# Altium PCB Zotino-DIOT.PCBDOC (part 10 of 11)
Units mil, origin at the board's own origin, x right, y up, seen from the top; angles counter-clockwise.
Board outline 8771.61 x 3949.04 mil, 4 copper layers (TopLayer, Internal Plane 2, Signal Layer 1, BottomLayer), stack 61.54 mil thick; 915 components, 534 nets, 3073 pads, 1180 vias.
Unrouted connection lines stored in the file: 36.
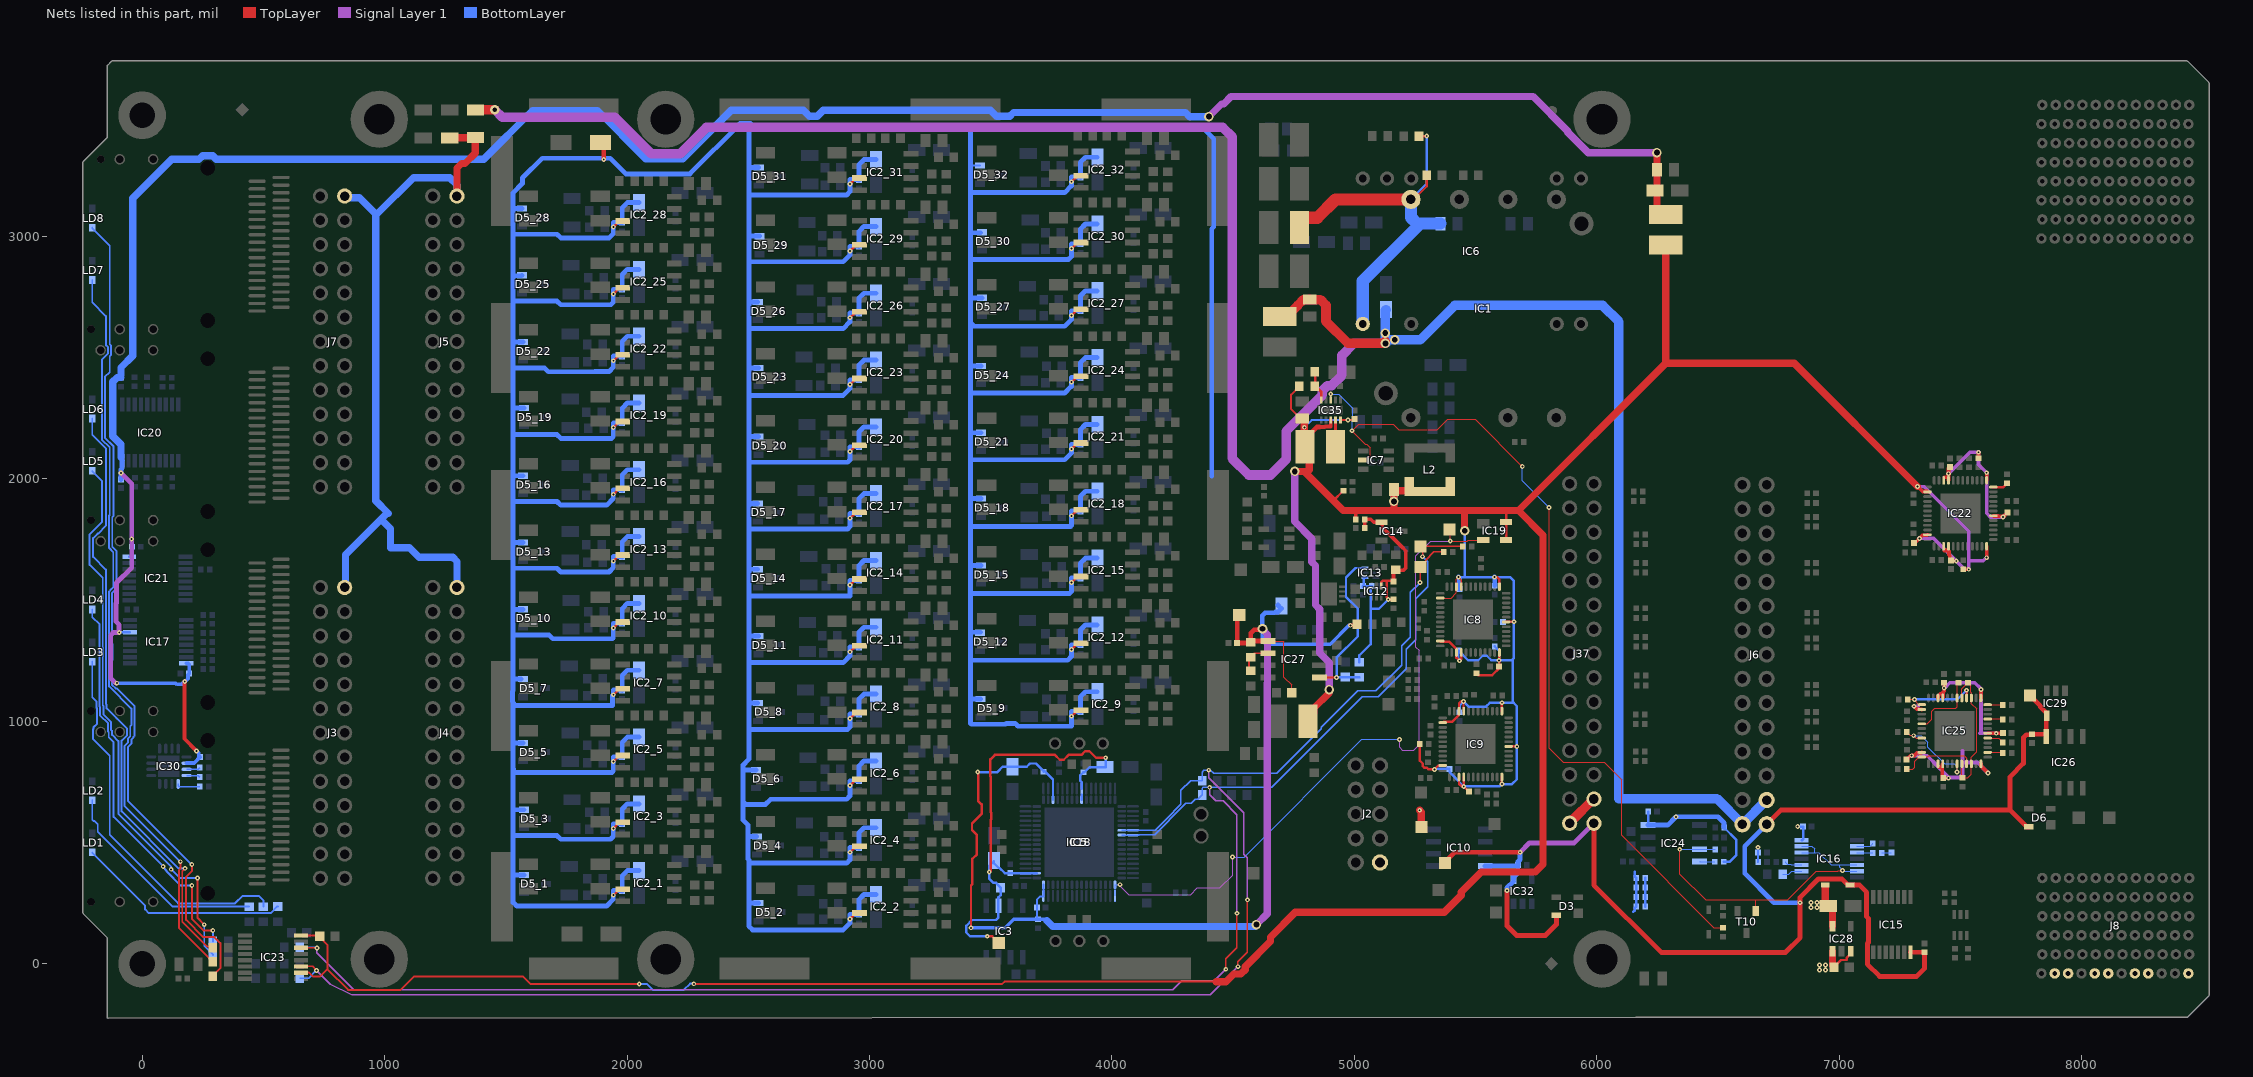
[diagram p11: the nets of this part, all layers, seen from the top]

## Via types
v1: diameter 19.68, hole 7.87, TopLayer to BottomLayer, tented both sides, 1050 vias
v2: diameter 23.62, hole 11.81, TopLayer to BottomLayer, tented both sides, 56 vias
v3: diameter 23.62, hole 11.81, TopLayer to BottomLayer, 28 vias
v4: diameter 39.37, hole 23.62, TopLayer to BottomLayer, tented both sides, 28 vias
v5: diameter 39.37, hole 19.68, TopLayer to BottomLayer, tented both sides, 7 vias
v6: diameter 19.68, hole 7.87, TopLayer to BottomLayer, tented bottom, 7 vias
v7: diameter 19.68, hole 7.87, TopLayer to BottomLayer, 4 vias

## Nets (pads, with @x,y where several pads share a name; then routed paths per layer and width w, separated by ;. In a path a pad name is that pad's centre, name@x,y a point inside that pad or via, vN(x,y) a via of type N, cw(c..) or ccw(c..) an arc to the next point about the centre after c; other vN are vias at no path point) (continued)
NetIC22_36: IC22.36 R100.2 | length 63.3
  TopLayer w10: IC22.36@7635.83,1966.54 7677.17,1966.54 7692.13,1981.5 R100.2@7692.91,1981.5
NetIC24_4: IC24.4 R221.1 | length 64.1
  BottomLayer w5: IC24.4@6423.76,422.31 6425,421.07 R221.1@6487.31,421.07
NetIC25_1: IC25.1 IC25.40 R112.2 | length 326.7
  TopLayer w5: R112.2@7282.28,1090.55 v1@7307.09,1090.55 ; v1@7309.06,1088.58 7328.74,1068.9 IC25.1@7340.55,1068.9
  TopLayer w10: v1(7525.06,1128.49) 7525.59,1127.95 IC25.40@7525.59,1096.46
  BottomLayer w10: v1(7311.02,1090.55) 7487.12,1090.55 v1(7525.06,1128.49) v1@7524.85,1128.7
NetIC25_5: IC25.5 IC25.42 R126.2 | length 295.2
  TopLayer w5: IC25.5@7340.55,990.16 7364.17,990.16 7381.89,1007.87 7381.89,1042.1 7394.91,1055.12 7480.32,1055.12 7486.22,1061.02 IC25.42@7486.22,1096.46 7486.22,1152.76 R126.2@7492.13,1158.66
NetIC25_8: IC25.8 IC25.19 R129.2 | length 373.5
  TopLayer w5: R129.2@7278.35,956.69 7278.35,955.91 7287.26,946.99 7288.05,946.99 7291.28,943.75 7304.28,943.75 v1(7307.09,940.94) 7316.93,931.1 IC25.8@7340.55,931.1 ; v1(7486.22,790.65) IC25.19@7486.22,824.8
  BottomLayer w5: v1(7307.09,940.94) 7338.58,940.94 7366.14,913.39 7366.14,893.7 7434.75,825.09 7474.17,825.09 7486.22,813.04 v1(7486.22,790.65)
NetIC25_12: IC25.12 IC25.21 R133.2 | length 311.6
  TopLayer w5: R133.2@7278.35,803.15 7303.15,803.15 7311.02,811.02 7311.02,834.65 7328.74,852.36 IC25.12@7340.55,852.36 7341.85,853.67 7365.48,853.67 7370.08,858.27 7515.75,858.27 7525.59,848.43 IC25.21@7525.59,824.8
NetIC25_20: IC25.20 IC25.22 IC25.39 IC25.41 R111.1 R132.1 | length 577.2
  TopLayer w5: IC25.20@7505.91,824.8 7505.91,768.5 R132.1@7507.87,766.54 7530.31,766.54 7545.28,781.5 IC25.22@7545.28,824.8 7545.28,852.36 7566.93,874.02 7566.93,1051.18 7545.28,1072.83 IC25.39@7545.28,1096.46 7543.97,1097.76 7543.97,1118.99 7543.1,1119.87 7543.1,1146.27 7541.2,1148.17 7541.2,1149.74 7532.28,1158.66 R111.1@7531.5,1158.66 7530.71,1158.66 7505.91,1133.86 IC25.41@7505.91,1096.46
NetIC25_26: IC25.26 R135.2 | length 67
  TopLayer w5: IC25.26@7612.2,872.05 7676.38,872.05 R135.2@7674.41,870.08
NetIC25_29: IC25.29 R131.2 | length 70
  TopLayer w5: IC25.29@7612.2,931.1 7657.48,931.1 7674.41,914.17 R131.2@7674.41,913.39
NetIC25_33: IC25.33 R128.2 | length 63
  TopLayer w5: IC25.33@7612.2,1009.84 7672.44,1009.84 R128.2@7674.41,1007.87
NetIC25_36: IC25.36 R125.2 | length 63
  TopLayer w5: IC25.36@7612.2,1068.9 7672.44,1068.9 R125.2@7674.41,1066.93
NetIC27_2: IC27.2 R150.1 R153.2 | length 142.5
  TopLayer w7.87: R153.2@4571.23,1205.91 4566.23,1210.91 4566.23,1260.91 4586.43,1281.11 IC27.2@4643.32,1281.11
NetIC30_1: IC30.1 R165.2 | length 98.7
  BottomLayer w6: IC30.1@148.62,742.13 148.62,734.17 152.22,730.58 R165.2@237.88,730.58
NetIC30_15: IC30.15 R159.2 | length 57.8
  BottomLayer w6: IC30.15@183.07,802.17 230.73,802.17 R159.2@237.88,809.32
NetIC30_16: IC30.16 R161.2 | length 57.6
  BottomLayer w6: IC30.16@183.07,776.57 231.25,776.57 R161.2@237.88,769.95
NetIC35_5: IC35.5 R162.1 R164.2 | length 117.5
  TopLayer w12: R164.2@4838.84,2432.89 4838.84,2382.89 4863.44,2358.28 IC35.5@4863.44,2325.57
NetIC35_9: IC35.9 L16.1 | length 75.6
  TopLayer w13: IC35.9@4922.5,2242.89 4922.5,2169.23 L16.1@4923.84,2167.89
NetLD1_2: LD1.2 R113.2 | length 891.4
  BottomLayer w8: LD1.2@-206,459.82 -206,457.85 11.81,240.04 11.81,224.41 26.94,209.28 530.82,209.28 558.03,236.5 R113.2@560,236.5
NetLD2_2: LD2.2 R114.2 | length 894
  BottomLayer w8: LD2.2@-206,674.82 -206,594.39 -201.31,589.71 -196.92,589.71 -183.22,576.01 -183.22,545.43 126.2,236 R114.2@441.2,236
NetLD3_2: LD3.2 R115.2 | length 1555.6
  BottomLayer w8: LD3.2@-206,1246.38 -206,1100.07 -188.61,1082.68 -188.61,1055.58 -186.12,1053.09 -186.12,991.05 -200.79,976.38 -200.79,970.29 -202.15,968.93 -202.15,926.56 -133.86,858.27 -133.86,531.5 148.64,249 382.86,249 414.33,280.47 481.26,280.47 500.26,261.47 R115.2@500.26,236
NetLD4_2: LD4.2 R119.2 | length 1625.1
  TopLayer w8: v1(204.72,322.83) 204.72,185.04 251.97,137.8 v1(291.34,137.8)
  BottomLayer w8: LD4.2@-206,1461.73 -206,1430.41 -175.61,1400.02 -175.61,1297.61 -175.35,1297.35 -175.35,1274.15 -175.61,1273.89 -175.61,1060.97 -173.12,1058.48 -173.12,1023.51 -140.95,991.35 -140.95,958.83 -137.8,955.67 -137.8,934.53 -118.11,914.84 -118.11,606.3 v1(86.61,401.57) 86.61,398.41 100.31,384.72 100.31,382.38 159.85,322.83 v1(204.72,322.83) ; v1(291.34,137.8) 291.34,92.56 R119.2@291.6,92.3
NetLD5_2: LD5.2 R120.2 | length 2288.3
  TopLayer w8: v1(228.35,354.33) 228.35,188.98 v1(255.91,161.42)
  BottomLayer w8: LD5.2@-206,2033.78 -206,2031.81 -165.35,1991.17 -165.35,1822.83 -216.54,1771.65 -216.54,1645.67 -162.61,1591.74 -162.61,1302.99 -162.35,1302.73 -162.35,1268.76 -162.61,1268.5 -162.61,1066.35 -160.12,1063.86 -160.12,1028.9 -127.95,996.73 -127.95,964.21 -124.41,960.66 -124.41,944.53 -98.43,918.55 -98.43,618.11 118.11,401.57 118.11,391.22 v1(119.57,389.76) 155,354.33 v1(228.35,354.33) ; v1(255.91,161.42) 255.91,74.84 291.6,39.15 R120.2@291.6,37.18
NetLD6_2: LD6.2 R121.2 | length 2490.1
  TopLayer w8: v1(177.17,393.7) 165.35,381.89 165.35,173.23 266.57,72.02 286.29,72.02 R121.2@291.6,66.71
  BottomLayer w8: LD6.2@-206,2249.13 -206,2182.38 -149.41,2125.79 -149.41,1807.09 -181.73,1774.77 -183.71,1774.77 -202.15,1756.33 -202.15,1678.53 -149.61,1625.98 -149.61,1308.38 -149.35,1308.12 -149.35,1263.38 -149.61,1263.12 -149.61,1071.74 -147.12,1069.25 -147.12,1053.85 -105.45,1012.19 -105.37,1012.19 -62.1,968.93 -62.1,943.53 -85.06,920.58 -85.06,628.36 149.61,393.7 v1(177.17,393.7)
NetLD7_2: LD7.2 R122.2 | length 3084.3
  TopLayer w8: v1(157.48,421.26) 157.48,392.4 152.35,387.27 152.35,146.9 R122.2@291.6,7.65
  BottomLayer w8: LD7.2@-206,2820.82 -206,2728.01 -149.61,2671.61 -149.61,2552.49 -140.84,2543.73 -140.84,2518.33 -166.54,2492.63 -166.54,2162.61 -133.86,2129.92 -133.86,1850.88 -136.41,1848.33 -136.41,1715.15 -119.3,1698.04 -119.3,1553.93 -129.92,1543.31 -129.92,1542.01 -136.61,1535.32 -136.61,1313.76 -136.35,1313.5 -136.35,1257.99 -136.61,1257.73 -136.61,1144.48 -44.5,1052.37 -44.5,984.25 -49.1,979.65 -49.1,938.15 -59.06,928.19 -59.06,912.09 -72.06,899.09 -72.06,650.8 v1(157.48,421.26)
NetLD8_2: LD8.2 R123.2 | length 3432.9
  TopLayer w8: v1(204.72,409.45) 204.72,381.89 181.1,358.27 181.1,181.1 251.97,110.24 298.2,110.24 310.52,97.92 322.83,85.6 322.83,-18.19 291.6,-49.43 R123.2@291.6,-51.4
  BottomLayer w8: LD8.2@-206,3036.69 -206,3034.72 -133.86,2962.58 -133.86,2555.13 -127.84,2549.11 -127.84,2512.95 -133.86,2506.93 -133.86,2440.94 -153.54,2421.26 -153.54,2169.29 -118.11,2133.86 -118.11,1848.24 -123.41,1842.94 -123.41,1720.53 -106.3,1703.42 -106.3,1547.24 -123.61,1529.94 -123.61,1319.15 -123.35,1318.89 -123.35,1252.61 -123.61,1252.35 -123.61,1149.86 -109.7,1135.96 -104.46,1135.96 -31.5,1062.99 -31.5,940.94 -36.1,936.34 -36.1,932.76 -43.31,925.56 -43.31,909.45 -59.06,893.7 -59.06,673.23 v1(204.72,409.45)
NetR220_1: R220.1 R225.2 | length 41.1
  BottomLayer w5: R220.1@7175.15,457.49 7213.94,457.49 R225.2@7215.58,459.13
P3V3: C19.2 C20.2 C21.2 C22.2 C23.2 C24.2 C25.2 C26.2 C49.2 C51.2 C52.2 C54.2 C55.2 C57.2 C58.2 C59.2 C69.2 C70.2 C96.2 C148.2 C149.2 IC8.2 IC8.11 IC8.15 IC8.16 IC8.24 IC8.30 IC8.37 IC8.45 IC8.46 IC9.2 IC9.11 IC9.15 IC9.16 IC9.24 IC9.30 IC9.37 IC9.45 IC9.46 IC19.3 IC19.4 IC22.2 IC22.11 IC22.15 IC22.16 IC22.24 IC22.30 IC22.37 IC22.45 IC22.46 IC23.10 IC23.16 IC25.2 IC25.11 IC25.15 IC25.16 IC25.24 IC25.30 IC25.37 IC25.45 IC25.46 IC35.8 IC35.10 L1.1 L2.2 L3.1 L16.2 R6.2 R18.1 R22.1 R33.2 R42.1 R95.2 R105.1 R162.2 TP10.1 | length 20128.9
  TopLayer w5: IC8.2@5354.32,1508.61 5399.89,1508.61 5421.25,1529.97 IC8.46@5421.25,1555.85 5421.25,1586.99 v1(5429.15,1594.89)
  TopLayer w8: IC23.10@655.77,-36.64 688.37,-36.64 703.84,-52.11 733.84,-52.11 763.84,-22.11 ; IC23.16@655.77,116.91 728.33,116.91 C96.2@732.34,112.89 732.34,109.39 763.84,77.89 763.84,-22.11 ; v1(2050.34,-83.2) 1601.02,-83.2 1569.93,-52.11 1122.05,-52.11 1066.26,-107.9 849.63,-107.9 763.84,-22.11 ; v1@2275.59,-83.2 3547.5,-83.2 3557.5,-73.2 4429,-73.2 ; C149.2@4768.84,2257.89 4738.84,2287.89 4738.84,2347.89 4772.89,2381.94 R162.2@4772.89,2382.65 ; C149.2@4793.84,2247.89 4795.85,2245.88 v1@4795.85,2212.89 ; IC35.10@4943.84,2242.89 v1(4973.84,2242.89) 4997.3,2242.89 C148.2@5001.24,2246.83 ; v1(5429.15,1594.89) 5440.94,1583.1 IC8.45@5440.94,1555.85
  TopLayer w10: 4914.27,1910.95 R33.2@4954.49,1951.17 ; R22.1@5269.64,905.89 5269.64,838.36 5282.34,825.66 5282.34,815.31 5288.2,809.45 5298.55,809.45 5306.11,801.89 v1(5330.15,801.89) 5346.05,817.79 IC9.11@5364.72,817.79 ; IC8.11@5354.32,1331.44 5356.45,1329.31 5390.76,1329.31 5421.25,1298.82 IC8.15@5421.25,1284.2 5421.25,1262.79 v1(5434.15,1249.89) 5440.94,1256.68 IC8.16@5440.94,1284.2 ; IC9.2@5364.72,994.95 5367.88,998.11 5403.37,998.11 5431.65,1026.39 IC9.46@5431.65,1042.2 5431.65,1073.85 5439.7,1081.89 v1(5450.15,1081.89) 5450.15,1043.39 IC9.45@5451.34,1042.2 ; IC9.15@5431.65,770.54 5431.65,741.73 5434.8,738.57 5436.61,738.57 5442.47,732.72 5442.47,731.89 v1(5451.32,731.89) C24.2@5472.83,710.37 ; v1(5451.32,731.89) IC9.16@5451.34,770.54 ; R18.1@5503.15,1198.39 5511.24,1190.29 5568.55,1190.29 5598.42,1220.16 v1@5598.42,1251.89 ; v1(5578.15,1594.89) 5588.15,1594.89 5598.42,1584.62 IC8.37@5598.42,1555.85 ; v1(5597.15,1251.89) v1@5598.42,1251.89 ; IC8.24@5598.42,1284.2 v1@5598.42,1251.89 ; v1(5608.82,741.22) IC9.24@5608.82,770.54 ; IC9.37@5608.82,1042.2 5608.82,1076.56 v1(5609.15,1076.89) ; 5614.36,1869.61 5625.75,1858.22 IC19.4@5625.75,1822.79 IC19.3@5625.75,1747.98 ; IC8.30@5625.97,1410.18 v1@5657.44,1410.18 ; IC9.30@5636.38,896.53 5669.79,896.53 v1(5670.15,896.89)
  TopLayer w15: 4857.05,2214.11 4877.11,2214.11 4879.61,2216.61 4902.81,2216.61 IC35.8@4902.81,2242.89 ; R42.1@5005.43,1833.49 5005.43,1869.28 5005.76,1869.61 ; C55.2@7277.56,842.52 7292.75,857.71 7297.91,857.71 v1(7298.81,858.61) 7299.36,859.15 7309.5,859.15 7321.12,870.77 7339.27,870.77 IC25.11@7340.55,872.05 ; v1(7309.06,1062.34) 7309.27,1062.34 7321.12,1050.49 7339.27,1050.49 IC25.2@7340.55,1049.21 ; C49.2@7309.06,1736.22 7313.76,1740.93 7317.26,1740.93 v1(7331,1754.67) 7344.74,1768.41 7362.89,1768.41 IC22.11@7364.17,1769.69 ; v1(7322.83,1968.5) 7324.36,1968.5 7344.74,1948.13 7362.89,1948.13 IC22.2@7364.17,1946.85 ; IC25.46@7407.48,1096.46 7407.48,1105.08 7416.57,1114.17 7422.5,1114.17 7428.44,1120.12 ; IC25.15@7409.07,814.59 7412.81,810.85 IC25.16@7425.57,810.85 ; IC25.16@7425.57,823.21 IC25.16@7425.57,810.85 ; IC25.45@7428.44,1097.74 7428.44,1120.12 ; IC22.15@7432.7,1705.1 7449.97,1705.1 7453.05,1702.02 7453.05,1688.43 ; C58.2@7433.07,1159.45 v1(7433.07,1137.4) 7433.07,1124.74 7428.44,1120.12 ; IC22.46@7434.5,2006.59 IC22.45@7446.92,2006.59 ; IC22.45@7450.79,1994.09 7450.79,2018.7 7450.79,2043.31 C52.2@7456.69,2049.21 ; v1(7451.18,765.75) C57.2@7429.13,765.75 7424.43,770.45 7424.43,809.71 IC25.16@7425.57,810.85 ; 7455.93,1684.06 7455.93,1668.09 C51.2@7460.63,1663.39 7461.7,1662.31 7481.78,1662.31 v1(7482.68,1661.42) ; R105.1@7511.81,1627.17 v1(7534.25,1627.17) ; R95.2@7574.8,2085.43 v1(7574.8,2110.24) ; IC25.24@7584.65,824.8 7584.65,816.18 7613.42,787.4 v1(7614.17,787.4) ; IC25.37@7584.65,1096.46 v1(7584.65,1131.89) ; v1(7608.27,1675.2) IC22.24@7608.27,1722.44 ; IC22.37@7608.27,1994.09 v1(7608.27,2025.59) ; IC25.30@7612.2,950.79 v1(7647.64,950.79) 7648.53,951.68 7674.12,951.68 C59.2@7675.2,952.76 ; IC22.30@7635.83,1848.43 7637.11,1847.15 7656.69,1847.15 7658.07,1845.77 v1@7675.72,1845.77 ; v1(7675.72,1843.04) C54.2@7694.88,1862.2
  TopLayer w20: L16.2@4795.85,2164.9 4845.06,2214.11 4857.05,2214.11
  TopLayer w30: 4429,-74 4470.52,-74 4502.87,-41.65 4532.05,-41.65 4549.53,-24.17 4549.53,-11.75 4654.61,93.33 4654.61,110.09 4756.65,212.13 5370.71,212.13 5441.02,282.45 5441.02,296.04 5523.54,378.55 5745.95,378.55 5778.23,410.83 5778.23,1768.24 5676.85,1869.61 ; v4(4753.7,2031.03) 4793.07,2031.03 4913.15,1910.95 ; C149.2@4785.61,2247.89 4793.84,2247.89 v1(4793.84,2212.89) 4793.84,2134.9 L16.2@4795.85,2132.89 ; L16.2@4795.85,2119.9 4783.84,2107.89 4813.84,2077.89 4813.84,2037.89 ; L1.1@4809.46,1012.62 4833.83,1036.99 4833.83,1055.06 4895.06,1116.29 4895.06,1129.4 v4(4896.86,1131.19) ; 4914.27,1910.95 4913.15,1910.95 ; v4(5163.48,1907.24) v4@5163.8,1906.92 ; v1(5269.45,633.39) 5276.34,626.5 TP10.1@5276.34,564.5 ; L2.2@5311.37,1948.12 5307.66,1951.82 5168.66,1951.82 C25.2@5163.8,1956.68 v4@5163.8,1906.92 ; v4(5455.46,1786.2) 5454.48,1787.18 5454.48,1869.61 ; L3.1@6284.45,2964.57 6284.45,2477.21 ; v1(7322.83,1968.5) 6814.13,2477.21 6284.45,2477.21 ; 4913.15,1910.95 4954.49,1869.61 5005.76,1869.61 5163.8,1869.61 ; 5163.8,1869.61 5454.48,1869.61 ; 5163.8,1869.61 v4@5163.8,1906.92 ; 5454.48,1869.61 5614.36,1869.61 5676.85,1869.61 ; 5676.85,1869.61 6284.45,2477.21
  Signal Layer 1 w15: v1(7298.81,858.61) 7363.23,858.61 7407.75,814.09 7407.75,812.62 7452.06,768.31 7495.47,768.31 7508.56,781.4 7508.56,830.09 ; v1(7309.06,1062.34) 7309.95,1061.44 7325.91,1061.44 ; v1(7322.83,1968.5) 7323.73,1967.61 7351.19,1967.61 7534.25,1784.54 7534.25,1669.29 ; v1(7331,1754.67) 7389.43,1754.67 v1(7482.68,1661.42) ; v1(7433.07,1137.4) 7434.34,1137.4 7456.39,1159.45 7559.64,1159.45 7583.75,1135.34 7583.75,1132.79 v1(7584.65,1131.89) 7584.65,954.87 7580.56,950.79 v1(7647.64,950.79) ; v1(7450.79,2021.65) 7539.37,2110.24 v1(7574.8,2110.24) 7574.8,2059.06 v1(7608.27,2025.59) 7608.27,1858.56 7623.79,1843.04 v1(7675.72,1843.04) ; v1@7483.57,1660.52 7516.93,1627.17 v1(7534.25,1627.17) 7534.25,1669.29 ; 7508.56,878.79 7508.56,830.09 ; v1(7608.27,1675.2) 7607.78,1675.2 7594.6,1662.02 7541.52,1662.02 7534.25,1669.29 ; v1(7614.17,787.4) 7571.48,830.09 7508.56,830.09
  Signal Layer 1 w30: v4@4753.7,2028.5 4753.7,1824.34 4824.56,1753.47 4824.56,1658.12 4839.66,1643.02 4839.66,1479.98 4857.57,1462.08 4857.57,1282.46 4896.86,1243.17 v4(4896.86,1131.19)
  BottomLayer w8: v1(2050.34,-83.2) 2081.86,-83.2 2106.56,-107.9 2233.16,-107.9 2259.74,-81.32 2274.23,-81.32 v1(2275.59,-82.68) ; v1(4793.84,2212.89) 4823.84,2242.89 v1(4973.84,2242.89)
  BottomLayer w10: v1(5330.15,801.89) 5332.15,803.89 C69.2@5392.43,803.89 5392.43,790.77 v1(5451.32,731.89) 5599.49,731.89 v1(5608.82,741.22) 5650.48,741.22 5670.15,760.89 v1(5670.15,896.89) 5670.15,1063.54 5656.8,1076.89 ; v1(5429.15,1594.89) 5455.15,1594.89 ; C70.2@5434.15,1037.61 5434.15,1065.89 v1(5450.15,1081.89) 5470.99,1061.05 5543.37,1061.05 5559.21,1076.89 v1(5609.15,1076.89) 5656.8,1076.89 ; v1(5434.15,1249.89) 5429.15,1254.89 C22.2@5429.15,1292.17 5469.43,1251.89 5511.09,1251.89 5529.93,1270.73 5546.37,1270.73 5565.21,1251.89 v1(5597.15,1251.89) ; v4(5455.46,1786.2) 5455.15,1785.88 5455.15,1594.89 ; C20.2@5579.15,1309.17 5597.15,1291.17 v1(5597.15,1251.89) ; C19.2@5612.86,1409.89 5657.15,1409.89 v1(5658.15,1410.89) ; 5455.15,1594.89 v1(5578.15,1594.89) 5642.05,1594.89 5658.15,1578.8 v1(5658.15,1410.89) ; v1(5597.15,1251.89) 5648.79,1251.89 5653.53,1256.64 ; 5653.53,1256.64 5658.15,1261.25 v1(5658.15,1410.89) ; 5653.53,1256.64 5653.53,1080.16 5656.8,1076.89
  BottomLayer w20: v1(5429.15,1594.89) 5433.15,1590.89 C23.2@5433.15,1546.61 ; v1(5578.15,1594.89) 5579.15,1593.89 C21.2@5579.15,1559.61
  BottomLayer w30: v4(5163.48,1907.24) 5163.64,1907.4 5163.64,1956.52 C26.2@5163.8,1956.68
P3V3_MP: C38.2 C39.2 C48.2 D3.4 D6.4 D7.1 IC10.8 IC15.14 IC26.8 IC29.4 IC32.4 J6.30 J37.30 TP13.1 TP21.1 | length 6121.2
  TopLayer w20: TP13.1@5366.16,412.92 5413.41,460.17 v1(5683.99,460.17) ; v1(5629.79,302.69) 5629.79,156.6 5669.54,116.85 5788.34,116.85 5833.73,162.24 D3.4@5833.73,199.98 ; J37.30@5988.23,579.89 5988.23,324.76 6265.75,47.24 6778.54,47.24 6838.58,107.28 6838.58,274.46 6914.51,350.39 7011.28,350.39 D7.1@7036.96,324.72 ; J6.30@6700.79,575.59 6759.06,633.86 7704.72,633.86 ; D7.1@7044.67,324.56 7083.9,324.56 7113.19,295.28 7113.19,195.31 7120.4,188.1 7120.4,88.14 7116.49,84.22 7116.49,-2.05 7166.6,-52.17 7319.88,-52.17 7351.39,-20.65 C39.2@7351.39,47.62 7351.26,47.49 7294.02,47.49 IC15.14@7293.89,47.36 ; D6.4@7781.5,564.96 7773.62,564.96 7704.72,633.86 ; TP21.1@7787.4,1106.3 7830.69,1063.01 7830.69,1059.08 7856.3,1033.46 IC29.4@7856.3,1023.62 7856.3,1013.78 7854.13,1011.61 IC26.8@7854.13,945.04 ; IC26.8@7854.13,937.01 IC26.8@7854.13,945.04 ; 7704.72,633.86 7704.72,771.65 7759.84,826.77 7759.84,933.07 7771.42,944.65 7793.07,944.65 C48.2@7795.28,946.85 7852.32,946.85 IC26.8@7854.13,945.04
  Signal Layer 1 w20: v1(5683.99,460.17) 5722.46,498.63 5906.97,498.63 J37.30@5988.23,579.89
  BottomLayer w20: IC10.8@5539.61,403.87 C38.2@5672.86,403.87 ; v1(5629.79,302.69) 5629.79,313.53 IC32.4@5657.11,340.85 ; IC32.4@5656.6,350.18 5656.6,360.02 5658.41,361.83 5662.12,361.83 5673.84,373.55 C38.2@5673.84,405.18 ; C38.2@5675.79,407.38 5675.79,421.4 5683.99,429.6 v1(5683.99,460.17) ; J6.30@6700.79,575.59 6610.24,485.04 6610.24,372.85 6731.12,251.97 v1(6838.58,251.97)
P3V3_MP_B: C43.2 C103.2 C109.1 D7.2 IC16.14 IC24.8 IC28.5 R76.1 R221.2 R226.2 R227.2 | length 936.9
  TopLayer w30: D7.2@6942.31,318.88 6942.31,248.61 6951.92,239 C109.1@6955.02,239 6962.91,239 6972.52,229.4 IC28.5@6972.52,153.9
  BottomLayer w10: IC24.8@6211.17,572.31 6212.37,573.52 C103.2@6212.37,627.51 ; R221.2@6524.31,421.07 6524.6,421.36 6549.26,421.36 6574.8,446.91 6574.8,512.25 6526.11,560.95 R76.1@6526.11,561.73 ; R227.2@6665.12,458.9 v1(6665.12,480.95) v1@6665.35,480.72 ; R226.2@6665.14,420.27 R227.2@6665.12,458.9 ; v1(6828.8,565.85) C43.2@6851.05,565.85 6851.05,514 6847.19,510.14 IC16.14@6844.99,510.14
  BottomLayer w20: IC24.8@6211.17,572.31 6292.78,572.31 v1(6326.77,606.3) 6500,606.3 6524.69,581.61 6524.69,563.15 R76.1@6526.11,561.73
  other v1: 6883.86,232.28 6908.46,232.28 6883.86,252.95 6908.46,252.95
P3V3_PSEQ: C30.2 C35.2 IC12.4 IC13.4 IC14.1 R35.1 R36.1 R37.2 R39.1 R41.2 R42.2 | length 1127.9
  TopLayer w10: IC12.4@5110.92,1558.92 5110.64,1559.2 5111.43,1560 5111.43,1575.02 5117.29,1580.88 5134.4,1580.88 ; C30.2@5161.59,1576.45 C30.2@5161.44,1576.59 ; R37.2@5164.97,1506.42 R37.2@5162.09,1503.53 5161.58,1503.03 5161.33,1503.28 5140.13,1503.28 v1(5139.88,1503.03) 5139.88,1505.65 5133.73,1511.8 5133.73,1580.21 5134.4,1580.88 ; C30.2@5165.59,1575.4 5162.92,1578.08 C30.2@5161.44,1576.59 ; 5134.4,1580.88 5157.16,1580.88 C30.2@5161.44,1576.59
  TopLayer w15: R36.1@5042.44,1798.27 R42.2@5042.44,1833.49 5042.85,1833.9 5068.13,1833.9 5081.22,1820.8 5112.16,1820.8 IC14.1@5112.45,1821.09 5115.87,1817.67 5115.87,1799.5 5194.36,1721.01 ; C30.2@5161.44,1576.59 5161.44,1614.71 R35.1@5171.67,1624.93 5173.83,1622.77 5201.78,1622.77 5211.63,1632.62 5211.63,1703.74 5194.36,1721.01 ; 5194.78,1721.01 5194.36,1721.01
  BottomLayer w10: R39.1@5021.13,1244.35 5021.13,1272.5 5067.45,1318.82 5067.45,1464.12 ; C35.2@5034.99,1555.81 5035.17,1556 5038.41,1559.23 5038.41,1592.76 5038.92,1593.27 IC13.4@5043.51,1593.27 5047.82,1593.27 IC13.4@5048.33,1592.76 ; C35.2@5035.17,1558 R41.2@5072.03,1558 ; R41.2@5067.45,1556 5067.45,1464.12 ; R41.2@5072.03,1556 R41.2@5072.21,1556.18 ; v1(5139.88,1503.03) 5100.98,1464.12 5067.45,1464.12
P3V3A: C11.2 C15.1 C44.2 C45.2 C46.2 C60.2 IC17.6 IC17.16 IC20.20 IC21.16 IC30.14 L3.2 R84.2 | length 10132
  TopLayer w15: v1(175.52,1164.28) 174.28,1163.04 174.28,928.08 v1(224.41,877.95)
  TopLayer w30: v4(6248.03,3346.46) C44.2@6248.03,3275.59 6248.03,3114.92 6272.4,3090.55 L3.2@6284.45,3090.55
  Signal Layer 1 w20: v1(-104.67,1157.57) -109.11,1157.57 -129.92,1178.39 -129.92,1355.41 -118.21,1367.13 v1@-95.47,1367.13 ; v1(-94.76,1367.13) v1@-95.47,1367.13 ; v1(-86.84,2024.09) -43.31,1980.55 -43.31,1633.86 -106.3,1570.87 -106.3,1488.19 -107.52,1486.97 -107.52,1410.67 -95.47,1398.62 v1@-95.47,1367.13
  Signal Layer 1 w30: v4(4400.18,3494.81) 4451.94,3546.58 4461.1,3546.58 4492.53,3578 5736.96,3578 5880.34,3434.62 5880.34,3429.76 5964.32,3345.78 6247.36,3345.78 v4(6248.03,3346.46)
  BottomLayer w10: v1(-94.76,1367.13) IC17.6@-50.2,1367.13 ; IC21.16@-53.15,1679.13 -45.2,1679.13 -41.34,1682.99 C46.2@-41.34,1720.47 -42.32,1721.46 -42.32,1750.98 v1(-43.31,1751.97)
  BottomLayer w15: v1(-104.67,1157.57) -104.57,1157.48 138.91,1157.48 143.93,1152.46 162.44,1152.46 174.26,1164.28 v1@175.56,1164.28 ; v1@178.96,1165.17 189.19,1175.4 189.19,1192.15 C11.2@193.9,1196.85 193.9,1235.31 190.04,1239.17 IC17.16@182.09,1239.17 ; IC30.14@183.07,827.76 183.68,828.37 214.41,828.37 C60.2@238.67,852.63 233.96,857.33 233.96,868.4 v1(224.41,877.95)
  BottomLayer w20: C45.2@-86.61,1998.03 -86.84,1998.26 -86.84,2040.24 -82.83,2044.25 -82.83,2073.66 IC20.20@-81.69,2074.8
  BottomLayer w30: IC20.20@-87.83,2088.35 -87.83,2142.95 -120.93,2176.04 -120.93,2400.54 -103.35,2418.11 R84.2@-87.6,2418.11 ; R84.2@-87.6,2429.13 -87.6,2459.65 -39.37,2507.87 -39.37,3157.48 122.05,3318.9 234.7,3318.9 249.31,3333.51 291.16,3333.51 305.77,3318.9 1409.45,3318.9 1610.24,3519.68 1877.95,3519.68 2077.25,3320.39 2229.84,3320.39 2429.96,3520.51 2727.52,3520.51 2752.2,3495.83 2785.14,3495.83 2809.83,3520.51 3499.17,3520.51 3523.62,3496.06 3578.74,3496.06 3594.49,3511.81 4303.15,3511.81 4320.49,3494.47 4399.84,3494.47 v4(4400.18,3494.81)
P12V0: C10.1 C129.2 J2.10 J6.28 J6.29 J37.28 J37.29 L8.2 R30.1 R65.2 R66.2 R71.2 R72.2 | length 10361.9
  TopLayer w39.37: R30.1@1374.27,3522.42 1453.75,3522.42 v5(1454.12,3522.79) v5@1454.49,3523.16 ; L8.2@4692.3,2670.8 4721.82,2670.8 4766.5,2715.47 4766.5,2716.43 4789.56,2739.5 4815.22,2739.5 C129.2@4816.2,2740.48 4817.19,2739.5 4860.07,2739.5 4883.13,2716.43 4883.13,2649.85 4973.16,2559.82 5119.96,2559.82 5128.15,2568 v4(5128.15,2558.89) ; J37.29@5892.46,585.75 J37.28@5991.64,684.93
  Signal Layer 1 w39.37: v5(1454.12,3522.79) 1485.76,3491.14 1949.91,3491.14 2100.06,3340.98 2218.36,3340.98 2327.82,3450.44 4457.42,3450.44 4495.6,3412.26 4495.6,2085.1 4564.34,2016.36 4654.12,2016.36 4718.27,2080.51 4718.27,2196.88 4868.29,2346.9 4868.29,2364.6 4888.51,2384.83 4906.22,2384.83 4948.58,2427.19 4948.58,2509.69 4997.79,2558.89 v4(5128.15,2558.89)
  BottomLayer w10: 6150.62,214.02 6156.18,219.57 6156.18,229.8 R65.2@6162.6,236.22 R66.2@6162.6,275.59 R71.2@6162.6,314.96 R72.2@6162.6,354.33 6156.18,360.75 6156.18,379.25
  BottomLayer w39.37: C10.1@5130.66,2698.32 5128.15,2695.81 v4(5128.15,2558.89) 5143.6,2574.34 v4(5167.09,2574.34) 5272.45,2574.34 5414.18,2716.07 6023.93,2716.07 6091.16,2648.84 6091.16,681.1 6495.28,681.1 J6.29@6600.79,575.59 J6.28@6700.79,675.59
  other v4: 5127.72,2601.9
P12V0_CPCIS: C108.2 IC28.1 IC28.3 J8.A1 J8.D1 J8.E1 J8.G1 J8.H1 J8.J1 J8.K1 R65.1 R66.1 R71.1 R72.1 | length 293.4
  TopLayer w10: C108.2@6978.35,-14.76 6978.35,-13.78 7007.87,15.75 7029.53,15.75 7031.73,17.95 7031.73,26.11 7047.32,41.7 IC28.3@7047.32,51.54
  TopLayer w30: IC28.1@6972.52,51.54 6972.52,-7.95 C108.2@6978.35,-13.78
  BottomLayer w10: R65.1@6199.61,236.22 R66.1@6199.61,275.59 R71.1@6199.61,314.96 R72.1@6199.61,354.33
  other v1: 6919.27,-25.16 6943.88,-25.16 6919.27,-4.49 6943.88,-4.49
P12V0A: C4.2 C31.2 C33.2 C47.1 C64.2 C90_1.1 C90_2.1 C90_3.1 C90_4.1 C90_5.1 C90_6.1 C90_7.1 C90_8.1 C90_9.1 C90_10.1 C90_11.1 C90_12.1 C90_13.1 C90_14.1 C90_15.1 C90_16.1 C90_17.1 C90_18.1 C90_19.1 C90_20.1 C90_21.1 C90_22.1 C90_23.1 C90_24.1 C90_25.1 C90_26.1 C90_27.1 C90_28.1 C90_29.1 C90_30.1 C90_31.1 C90_32.1 C91_1.2 C91_2.2 C91_3.2 C91_4.2 C91_5.2 C91_6.2 C91_7.2 C91_8.2 C91_9.2 C91_10.2 C91_11.2 C91_12.2 C91_13.2 C91_14.2 C91_15.2 C91_16.2 C91_17.2 C91_18.2 C91_19.2 C91_20.2 C91_21.2 C91_22.2 C91_23.2 C91_24.2 C91_25.2 C91_26.2 C91_27.2 C91_28.2 C91_29.2 C91_30.2 C91_31.2 C91_32.2 C124.1 D1.1 D5_1.2 D5_2.2 D5_3.2 D5_4.2 D5_5.2 D5_6.2 D5_7.2 D5_8.2 D5_9.2 D5_10.2 D5_11.2 D5_12.2 D5_13.2 D5_14.2 D5_15.2 D5_16.2 D5_17.2 D5_18.2 D5_19.2 D5_20.2 D5_21.2 D5_22.2 D5_23.2 D5_24.2 D5_25.2 D5_26.2 D5_27.2 D5_28.2 D5_29.2 D5_30.2 D5_31.2 D5_32.2 IC2_1.7 IC2_2.7 IC2_3.7 IC2_4.7 IC2_5.7 IC2_6.7 IC2_7.7 IC2_8.7 IC2_9.7 IC2_10.7 IC2_11.7 IC2_12.7 IC2_13.7 IC2_14.7 IC2_15.7 IC2_16.7 IC2_17.7 IC2_18.7 IC2_19.7 IC2_20.7 IC2_21.7 IC2_22.7 IC2_23.7 IC2_24.7 IC2_25.7 IC2_26.7 IC2_27.7 IC2_28.7 IC2_29.7 IC2_30.7 IC2_31.7 IC2_32.7 IC5.16 IC5.35 IC18.16 IC18.35 IC27.1 R3.1 R43.2 R150.2 TP8.1 | length 42119.7
  TopLayer w5: IC27.1@4643.32,1331.11 4706.59,1331.11 4709.52,1328.18 4709.52,1182.63 4741.74,1150.4 C64.2@4741.74,1118.32
  TopLayer w10: v1(1943.56,283) 1963.56,303 1977.31,303 IC2_1.7@1982.31,308 ; v1(1943.56,558.59) 1963.56,578.59 1977.31,578.59 IC2_3.7@1982.31,583.59 ; v1(1943.56,834.18) 1963.56,854.18 1977.31,854.18 IC2_5.7@1982.31,859.18 ; v1(1943.56,1109.77) 1963.56,1129.77 1977.31,1129.77 IC2_7.7@1982.31,1134.77 ; v1(1943.56,1385.36) 1963.56,1405.36 1977.31,1405.36 IC2_10.7@1982.31,1410.36 ; v1(1943.56,1660.95) 1963.56,1680.95 1977.31,1680.95 IC2_13.7@1982.31,1685.95 ; v1(1943.56,1936.54) 1963.56,1956.54 1977.31,1956.54 IC2_16.7@1982.31,1961.54 ; v1(1943.56,2212.13) 1963.56,2232.13 1977.31,2232.13 IC2_19.7@1982.31,2237.13 ; v1(1943.56,2487.72) 1963.56,2507.72 1977.31,2507.72 IC2_22.7@1982.31,2512.72 ; v1(1943.56,2763.32) 1963.56,2783.32 1977.31,2783.32 IC2_25.7@1982.31,2788.32 ; v1(1943.56,3038.91) 1963.56,3058.91 1977.31,3058.91 IC2_28.7@1982.31,3063.91 ; v1(2919.94,184.57) 2939.94,204.57 2953.68,204.57 IC2_2.7@2958.68,209.57 ; v1(2919.94,460.17) 2939.94,480.17 2953.68,480.17 IC2_4.7@2958.68,485.17 ; v1(2919.94,735.76) 2939.94,755.76 2953.68,755.76 IC2_6.7@2958.68,760.76 ; v1(2919.94,1011.35) 2939.94,1031.35 2953.68,1031.35 IC2_8.7@2958.68,1036.35 ; v1(2919.94,1286.94) 2939.94,1306.94 2953.68,1306.94 IC2_11.7@2958.68,1311.94 ; v1(2919.94,1562.53) 2939.94,1582.53 2953.68,1582.53 IC2_14.7@2958.68,1587.53 ; v1(2919.94,1838.12) 2939.94,1858.12 2953.68,1858.12 IC2_17.7@2958.68,1863.12 ; v1(2919.94,2113.71) 2939.94,2133.71 2953.68,2133.71 IC2_20.7@2958.68,2138.71 ; v1(2919.94,2389.3) 2939.94,2409.3 2953.68,2409.3 IC2_23.7@2958.68,2414.3 ; v1(2919.94,2664.89) 2939.94,2684.89 2953.68,2684.89 IC2_26.7@2958.68,2689.89 ; v1(2919.94,2940.48) 2939.94,2960.48 2953.68,2960.48 IC2_29.7@2958.68,2965.48 ; v1(2919.94,3216.07) 2939.94,3236.07 2953.68,3236.07 IC2_31.7@2958.68,3241.07 ; v1(3418.9,148.28) 3418.9,322.72 3424.64,328.46 3424.64,433.15 3442.83,451.35 3442.83,531.38 3422.83,551.38 3422.83,578.62 3462.51,618.3 3462.51,657.36 3448.27,671.6 v1@3448.27,786.78 ; v1(3833.33,1021.19) 3853.33,1041.19 3867.07,1041.19 IC2_9.7@3872.07,1046.19 ; v1(3833.33,1296.78) 3853.33,1316.78 3867.07,1316.78 IC2_12.7@3872.07,1321.78 ; v1(3833.33,1572.37) 3853.33,1592.37 3867.07,1592.37 IC2_15.7@3872.07,1597.37 ; v1(3833.33,1847.96) 3853.33,1867.96 3867.07,1867.96 IC2_18.7@3872.07,1872.96 ; v1(3833.33,2123.55) 3853.33,2143.55 3867.07,2143.55 IC2_21.7@3872.07,2148.55 ; v1(3833.33,2399.14) 3853.33,2419.14 3867.07,2419.14 IC2_24.7@3872.07,2424.14 ; v1(3833.33,2674.73) 3853.33,2694.73 3867.07,2694.73 IC2_27.7@3872.07,2699.73 ; v1(3833.33,2950.32) 3853.33,2970.32 3867.07,2970.32 IC2_30.7@3872.07,2975.32 ; v1(3833.33,3225.91) 3853.33,3245.91 3867.07,3245.91 IC2_32.7@3872.07,3250.91
  TopLayer w15: v1(4983.6,1396.3) R43.2@5003.44,1396.3
  TopLayer w20: v1(1903.8,3317.72) D1.1@1903.8,3383.64 ; TP8.1@4525.35,1438.57 4516.84,1430.06 C33.2@4516.84,1322.8 4568.27,1322.8 R150.2@4572.45,1326.98 ; v4(4621.17,1381.85) 4617.46,1378.14 4586.36,1378.14 4572.45,1364.23 R150.2@4572.45,1326.98 ; IC27.1@4641.73,1332.7 IC27.1@4643.32,1331.11 4576.58,1331.11 R150.2@4572.45,1326.98 ; R43.2@5003.44,1396.3 5008.66,1401.51 R43.2@5011.16,1401.51
  Signal Layer 1 w30: v4(4596.22,161.94) 4641.07,206.79 4641.07,1158.27 4641.73,1158.93 4641.73,1358.76 4622.96,1377.52 4622.96,1379.31 v4@4625.5,1381.85
  BottomLayer w7.87: 3416.17,3290.87 3418.14,3292.84 D5_32.2@3456.46,3292.84 ; R3.1@3690.71,187.33 3690.71,263.31 3705.18,277.79 3717.57,277.79 IC5.16@3717.57,280.05 IC18.16@3717.57,326.31
  BottomLayer w10: v1(3446.61,790.87) 3527.37,790.87 3549.05,812.55 C47.1@3590.31,812.55 3648.63,812.55 3662.24,826.16 3687.1,826.16 3717.98,795.28 C4.2@3717.98,792.16 ; C4.2@3721.33,795.52 3756.94,759.91 IC5.35@3756.94,722.96 IC18.35@3756.94,676.7
  BottomLayer w15: v1(3418.9,148.28) 3559.93,148.28 3595.04,183.39 R3.1@3694.65,183.39 3726.14,183.39 3731.18,178.35 ; v4(4621.17,1381.85) 4621.17,1331.21 4634.08,1318.31 4900.31,1318.31 4978.3,1396.3 v1(4983.6,1396.3)
  BottomLayer w20: 1531.75,2292.84 D5_19.2@1574.57,2292.84 ; D5_7.2@1562.76,1174.54 1531.95,1174.54 1529.78,1176.7 ; D5_25.2@1566.69,2840.09 1564.72,2838.12 1529.78,2838.12 ; D5_28.2@1566.69,3115.68 1531.75,3115.68 1529.78,3117.65 ; D5_5.2@1570.63,910.95 1531.75,910.95 1529.78,912.92 ; D5_10.2@1570.63,1462.13 1531.75,1462.13 1529.78,1460.17 ; D5_13.2@1570.63,1737.72 1531.75,1737.72 1529.78,1735.76 ; D5_16.2@1570.63,2013.32 1531.75,2013.32 1529.78,2011.35 ; D5_22.2@1570.63,2564.5 1531.75,2564.5 1529.78,2562.53 ; D5_1.2@1574.57,366.91 1532.49,366.91 1529.78,369.61 ; D5_3.2@1574.57,635.36 1531.75,635.36 1529.78,637.33 ; C91_1.2@1980,300.72 C91_1.2@1980,302.18 ; C91_3.2@1980,576.31 C91_3.2@1980,577.77 ; C91_5.2@1980,851.9 C91_5.2@1980,853.36 ; C91_7.2@1980,1127.49 C91_7.2@1980,1128.95 ; C91_10.2@1980,1403.08 C91_10.2@1980,1404.54 ; C91_13.2@1980,1678.67 C91_13.2@1980,1680.13 ; C91_16.2@1980,1954.26 C91_16.2@1980,1955.73 ; C91_19.2@1980,2229.85 C91_19.2@1980,2231.32 ; C91_22.2@1980,2505.44 C91_22.2@1980,2506.91 ; C91_25.2@1980,2781.03 C91_25.2@1980,2782.5 ; C91_28.2@1980,3056.62 C91_28.2@1980,3058.09 ; C90_1.1@2050,384.18 2001.18,384.18 1980,363 C91_1.2@1980,302.18 ; C90_3.1@2050,659.77 2001.18,659.77 1980,638.59 C91_3.2@1980,577.77 ; C90_5.1@2050,935.36 2001.18,935.36 1980,914.18 C91_5.2@1980,853.36 ; C90_7.1@2050,1210.95 2001.18,1210.95 1980,1189.77 C91_7.2@1980,1128.95 ; C90_10.1@2050,1486.54 2001.18,1486.54 1980,1465.36 C91_10.2@1980,1404.54 ; C90_13.1@2050,1762.13 2001.18,1762.13 1980,1740.95 C91_13.2@1980,1680.13 ; C90_16.1@2050,2037.72 2001.18,2037.72 1980,2016.54 C91_16.2@1980,1955.73 ; C90_19.1@2050,2313.32 2001.18,2313.31 1980,2292.13 C91_19.2@1980,2231.32 ; C90_22.1@2050,2588.91 2001.18,2588.9 1980,2567.73 C91_22.2@1980,2506.91 ; C90_25.1@2050,2864.5 2001.18,2864.5 1980,2843.32 C91_25.2@1980,2782.5 ; C90_28.1@2050,3140.09 2001.18,3140.09 1980,3118.91 C91_28.2@1980,3058.09 ; 2504.75,1351.9 D5_11.2@2543.07,1351.9 ; 2508.9,966.66 2909.8,966.66 2919.29,976.15 2919.29,1011.35 2919.29,1030.53 C91_8.2@2956.38,1030.53 ; D5_6.2@2531.88,799.96 2480.05,799.96 2478.84,798.75 ; D5_4.2@2535.2,525.13 2501.5,525.13 2499.53,527.09 ; D5_17.2@2539.13,1899.14 2504.75,1899.14 2502.78,1901.11 ; D5_26.2@2539.13,2729.85 2504.75,2729.85 2502.78,2731.82 ; D5_8.2@2539.33,1076.31 2504.75,1076.31 2502.78,1074.34 ; D5_14.2@2539.33,1627.49 2504.75,1627.49 2502.78,1629.46 ; D5_2.2@2543.07,250.75 2505.97,250.75 2502.78,247.57 ; D5_20.2@2543.07,2174.73 2504.75,2174.73 2502.78,2176.7 ; D5_23.2@2543.07,2458.2 2503.53,2458.2 2502.78,2458.94 ; D5_31.2@2543.27,3284.97 2503.53,3284.97 2502.78,3285.72 ; D5_29.2@2547.01,3001.5 2504.75,3001.5 2502.78,3003.47 ; C91_2.2@2956.38,202.29 C91_2.2@2956.38,203.76 ; C91_4.2@2956.38,477.88 C91_4.2@2956.38,479.35 ; C91_6.2@2956.38,753.47 C91_6.2@2956.38,754.94 ; C91_8.2@2956.38,1029.06 C91_8.2@2956.38,1030.53 ; C91_11.2@2956.38,1304.65 C91_11.2@2956.38,1306.12 ; C91_14.2@2956.38,1580.24 C91_14.2@2956.38,1581.71 ; C91_17.2@2956.38,1855.83 C91_17.2@2956.38,1857.3 ; C91_20.2@2956.38,2131.43 C91_20.2@2956.38,2132.89 ; C91_23.2@2956.38,2407.01 C91_23.2@2956.38,2408.48 ; C91_26.2@2956.38,2682.61 C91_26.2@2956.38,2684.07 ; C91_29.2@2956.38,2958.2 C91_29.2@2956.38,2959.66 ; C91_31.2@2956.38,3233.79 C91_31.2@2956.38,3235.25 ; C90_2.1@3026.38,285.76 2977.56,285.76 2956.38,264.58 C91_2.2@2956.38,203.76 ; C90_4.1@3026.38,561.35 2977.56,561.35 2956.38,540.17 C91_4.2@2956.38,479.35 ; C90_6.1@3026.38,836.94 2977.56,836.94 2956.38,815.76 C91_6.2@2956.38,754.94 ; C90_8.1@3026.38,1112.53 2977.56,1112.53 2956.38,1091.35 C91_8.2@2956.38,1030.53 ; C90_11.1@3026.38,1388.12 2977.56,1388.12 2956.38,1366.94 C91_11.2@2956.38,1306.12 ; C90_14.1@3026.38,1663.71 2977.56,1663.71 2956.38,1642.53 C91_14.2@2956.38,1581.71 ; C90_17.1@3026.38,1939.3 2977.56,1939.3 2956.38,1918.12 C91_17.2@2956.38,1857.3 ; C90_20.1@3026.38,2214.89 2977.56,2214.89 2956.38,2193.71 C91_20.2@2956.38,2132.89 ; C90_23.1@3026.38,2490.48 2977.56,2490.48 2956.38,2469.3 C91_23.2@2956.38,2408.48 ; C90_26.1@3026.38,2766.07 2977.56,2766.07 2956.38,2744.89 C91_26.2@2956.38,2684.07 ; C90_29.1@3026.38,3041.66 2977.56,3041.66 2956.38,3020.48 C91_29.2@2956.38,2959.66 ; C90_31.1@3026.38,3317.25 2977.56,3317.25 2956.38,3296.07 C91_31.2@2956.38,3235.25 ; D5_30.2@3458.43,3015.28 3424.04,3015.28 3416.17,3023.16 ; D5_9.2@3458.62,1092.06 3418.14,1092.06 3416.17,1090.09 ; D5_12.2@3458.62,1367.65 3418.14,1367.65 3416.17,1365.68 ; D5_15.2@3459.66,1643.24 3418.14,1643.24 3416.17,1645.2 ; D5_18.2@3460.39,1918.83 3418.14,1918.83 3416.17,1916.86 ; D5_21.2@3460.39,2190.48 3418.14,2190.48 3416.17,2192.45 ; D5_24.2@3460.39,2466.07 3418.14,2466.07 3416.17,2464.1 ; D5_27.2@3464.33,2747.01 3419.55,2747.01 3416.17,2743.63 ; C91_9.2@3869.76,1038.91 C91_9.2@3869.76,1040.37 ; C91_12.2@3869.76,1314.5 C91_12.2@3869.76,1315.96 ; C91_15.2@3869.76,1590.09 C91_15.2@3869.76,1591.55 ; C91_18.2@3869.76,1865.68 C91_18.2@3869.76,1867.14 ; C91_21.2@3869.76,2141.27 C91_21.2@3869.76,2142.73 ; C91_24.2@3869.76,2416.86 C91_24.2@3869.76,2418.32 ; C91_27.2@3869.76,2692.45 C91_27.2@3869.76,2693.91 ; C91_30.2@3869.76,2968.04 C91_30.2@3869.76,2969.5 ; C91_32.2@3869.76,3243.63 C91_32.2@3869.76,3245.09 ; C90_9.1@3939.76,1122.37 3890.94,1122.37 3869.76,1101.19 C91_9.2@3869.76,1040.37 ; C90_12.1@3939.76,1397.96 3890.94,1397.96 3869.76,1376.78 C91_12.2@3869.76,1315.96 ; C90_15.1@3939.76,1673.55 3890.94,1673.55 3869.76,1652.37 C91_15.2@3869.76,1591.55 ; C90_18.1@3939.76,1949.14 3890.94,1949.14 3869.76,1927.96 C91_18.2@3869.76,1867.14 ; C90_21.1@3939.76,2224.73 3890.94,2224.73 3869.76,2203.55 C91_21.2@3869.76,2142.73 ; C90_24.1@3939.76,2500.32 3890.94,2500.32 3869.76,2479.14 C91_24.2@3869.76,2418.32 ; C90_27.1@3939.76,2775.91 3890.94,2775.91 3869.76,2754.73 C91_27.2@3869.76,2693.91 ; C90_30.1@3939.76,3051.5 3890.94,3051.5 3869.76,3030.32 C91_30.2@3869.76,2969.5 ; C90_32.1@3939.76,3327.09 3890.94,3327.09 3869.76,3305.91 C91_32.2@3869.76,3245.09 ; 4411.93,2011.07 4411.93,3031.48 4420,3039.55 4420,3403 4368.75,3454.25 3894.48,3454.25 3890.44,3458.28 3416.17,3458.28 ; v4(4621.17,1381.85) 4620.1,1382.92 4620.1,1436.2 4631.82,1447.92 4670.84,1447.92 4673.64,1450.72 4684.47,1450.72 4699.07,1465.33 C124.1@4684.47,1479.94 ; 1529.78,369.61 1529.78,529.09 ; 1529.78,369.61 1529.78,253.5 1544.97,238.31 1915.43,238.31 1942.91,265.8 1942.91,302.18 C91_1.2@1980,302.18 ; 1529.78,529.09 1529.78,637.33 ; 1529.78,529.09 1711.16,529.09 1726.35,513.91 1931.71,513.91 1942.91,525.11 1942.91,577.77 C91_3.2@1980,577.77 ; 1529.78,637.33 1529.78,804.68 ; 1529.78,804.68 1529.78,912.92 ; 1529.78,804.68 1532.34,804.68 1532.34,789.5 1937.36,789.5 1942.91,795.05 1942.91,853.36 C91_5.2@1980,853.36 ; 1529.78,912.92 1529.78,1078.03 ; 1529.78,1078.03 1532.34,1075.47 1532.34,1065.09 1939.59,1065.09 1939.59,1106.45 1942.91,1109.77 1942.91,1128.95 C91_7.2@1980,1128.95 ; 1529.78,1078.03 1527.09,1080.73 1527.09,1124 1529.78,1126.7 1529.78,1176.7 ; 1529.78,1176.7 1529.78,1355.86 ; 1529.78,1355.86 1678.9,1355.86 1694.08,1340.68 1939.59,1340.68 1942.91,1344 1942.91,1404.54 C91_10.2@1980,1404.54 ; 1529.78,1355.86 1529.78,1460.17 ; 1529.78,1460.17 1529.78,1631.45 ; 1529.78,1631.45 1529.78,1735.76 ; 1529.78,1631.45 1711.16,1631.45 1726.35,1616.27 1925.55,1616.27 1942.91,1633.63 1942.91,1680.13 C91_13.2@1980,1680.13 ; 1529.78,1735.76 1529.78,1907.04 ; 1529.78,1907.04 1529.78,2011.35 ; 1529.78,1907.04 1711.16,1907.04 1726.35,1891.86 1915.43,1891.86 1942.91,1919.35 1942.91,1955.73 C91_16.2@1980,1955.73 ; 1529.78,2011.35 1529.78,2182.63 ; 1529.78,2182.63 1529.78,2458.23 ; 1529.78,2182.63 1711.16,2182.63 1726.35,2167.45 1935.65,2167.45 1942.91,2174.71 1942.91,2231.32 C91_19.2@1980,2231.32 ; 1529.78,2458.23 1659.21,2458.23 1675.23,2442.21 1867.05,2442.21 1867.87,2443.04 1925.55,2443.04 1942.91,2460.4 1942.91,2506.91 C91_22.2@1980,2506.91 ; 1529.78,2458.23 1529.78,2562.53 ; 1529.78,2562.53 1529.78,2733.82 ; 1529.78,2733.82 1529.78,2838.12 ; 1529.78,2733.82 1711.16,2733.82 1726.35,2718.63 1933.43,2718.63 1942.91,2728.12 1942.91,2782.5 C91_25.2@1980,2782.5 ; 1529.78,2838.12 1529.78,3009.41 ; 1529.78,3009.41 1529.78,3117.65 ; 1529.78,3009.41 1711.16,3009.41 1726.35,2994.22 1926.54,2994.22 1942.91,3010.59 1942.91,3058.09 C91_28.2@1980,3058.09 ; 1529.78,3117.65 1529.78,3180.13 1568.48,3218.82 1568.48,3241.48 1650,3323 1903.8,3323 1930,3323 1994.57,3258.43 2259.38,3258.43 2466.45,3465.5 2502.78,3465.5 2510,3465.5 2502.78,3458.28 ; 2478.84,668.1 2478.84,798.75 ; 2478.84,668.1 2478.84,613.34 2479,613.18 2479,592.6 2499.53,572.07 2499.53,527.09 ; 2478.84,668.1 2489.92,657.02 2570.6,657.02 2592.28,678.7 2905.93,678.7 2919.29,692.06 2919.29,735.76 2919.29,754.94 C91_6.2@2956.38,754.94 ; 2478.84,798.75 2478.84,820.11 2502.78,844.05 2502.78,966.66 2502.78,981.85 2504.31,981.85 2503.66,982.5 2503.66,1022.28 2502.78,1023.16 2502.78,1074.34 ; 2499.53,527.09 2499.53,431.31 2502.78,428.06 2502.78,412.92 ; 2502.78,247.57 2502.78,412.92 ; 2502.78,247.57 2502.78,155.08 2517.97,139.89 2891.8,139.89 2919.29,167.38 2919.29,184.57 2919.29,203.76 C91_2.2@2956.38,203.76 ; 2502.78,412.92 2505.34,415.48 2905.87,415.48 2919.29,428.91 2919.29,460.17 2919.29,479.35 C91_4.2@2956.38,479.35 ; 2502.78,1074.34 2502.78,1239.69 ; 2502.78,1239.69 2502.78,1351.9 2502.78,1521.19 ; 2502.78,1239.69 2505.34,1242.25 2891.8,1242.25 2919.29,1269.74 2919.29,1286.94 2919.29,1306.12 C91_11.2@2956.38,1306.12 ; 2502.78,1521.19 2502.78,1629.46 ; 2502.78,1521.19 2506.13,1517.84 2919.29,1517.84 2919.29,1562.53 2919.29,1581.71 C91_14.2@2956.38,1581.71 ; 2502.78,1629.46 2502.78,1795.99 ; 2502.78,1795.99 2502.78,1901.11 ; 2502.78,1795.99 2505.34,1793.43 2909.8,1793.43 2919.29,1802.92 2919.29,1838.12 2919.29,1857.3 C91_17.2@2956.38,1857.3 ; 2502.78,1901.11 2502.78,2066.46 ; 2502.78,2066.46 2502.78,2176.7 ; 2502.78,2066.46 2505.34,2069.02 2909.8,2069.02 2919.29,2078.51 2919.29,2113.71 2919.29,2132.89 C91_20.2@2956.38,2132.89 ; 2502.78,2176.7 2502.78,2345.99 ; 2502.78,2345.99 2502.78,2458.94 ; 2502.78,2345.99 2504.16,2344.61 2891.8,2344.61 2919.29,2372.1 2919.29,2389.3 2919.29,2408.48 C91_23.2@2956.38,2408.48 ; 2502.78,2458.94 2502.78,2617.65 ; 2502.78,2617.65 2502.78,2731.82 ; 2502.78,2617.65 2505.34,2620.2 2891.8,2620.2 2919.29,2647.69 2919.29,2664.89 2919.29,2684.07 C91_26.2@2956.38,2684.07 ; 2502.78,2731.82 2502.78,2893.24 ; 2502.78,2893.24 2502.78,3003.47 ; 2502.78,2893.24 2505.34,2895.8 2891.8,2895.8 2919.29,2923.28 2919.29,2940.48 2919.29,2959.66 C91_29.2@2956.38,2959.66 ; 2502.78,3003.47 2502.78,3168.83 ; 2502.78,3168.83 2502.78,3285.72 ; 2502.78,3168.83 2505.34,3171.39 2905.87,3171.39 2919.29,3184.81 2919.29,3216.07 2919.29,3235.25 C91_31.2@2956.38,3235.25 ; 2502.78,3285.72 2502.78,3458.28 ; 2502.78,3458.28 2510,3458.28 3416.17,3458.28 ; 3416.17,1090.09 3416.17,1251.5 ; 3416.17,1090.09 3416.17,991.69 3420.02,987.84 3560.88,987.84 3564.72,991.69 3600.92,991.69 3612.53,980.09 3832.68,980.09 3832.68,1021.19 3832.68,1040.37 C91_9.2@3869.76,1040.37 ; 3416.17,1251.5 3416.17,1365.68 ; 3416.17,1251.5 3416.76,1252.09 3817.11,1252.09 3832.68,1267.66 3832.68,1296.78 3832.68,1315.96 C91_12.2@3869.76,1315.96 ; 3416.17,1365.68 3416.17,1523.16 ; 3416.17,1523.16 3416.17,1645.2 ; 3416.17,1523.16 3420.7,1527.68 3825.16,1527.68 3832.68,1535.21 3832.68,1572.37 3832.68,1591.55 C91_15.2@3869.76,1591.55 ; 3416.17,1645.2 3416.17,1802.69 ; 3416.17,1802.69 3416.17,1916.86 ; 3416.17,1802.69 3416.76,1803.28 3829.09,1803.28 3832.68,1806.86 3832.68,1847.96 3832.68,1867.14 C91_18.2@3869.76,1867.14 ; 3416.17,1916.86 3416.17,2078.28 ; 3416.17,2078.28 3416.17,2192.45 ; 3416.17,2078.28 3416.76,2078.87 3805.19,2078.87 3832.68,2106.35 3832.68,2123.55 3832.68,2142.73 C91_21.2@3869.76,2142.73 ; 3416.17,2192.45 3416.17,2349.93 ; 3416.17,2349.93 3416.17,2464.1 ; 3416.17,2349.93 3420.7,2354.46 3805.19,2354.46 3832.68,2381.94 3832.68,2399.14 3832.68,2418.32 C91_24.2@3869.76,2418.32 ; 3416.17,2464.1 3416.17,2645.23 ; 3416.17,2645.23 3416.17,2743.63 ; 3416.17,2645.23 3431.36,2630.05 3805.19,2630.05 3832.68,2657.54 3832.68,2674.73 3832.68,2693.91 C91_27.2@3869.76,2693.91 ; 3416.17,2743.63 3416.17,2901.11 ; 3416.17,2901.11 3416.17,3015.28 3416.17,3023.16 ; 3416.17,2901.11 3420.7,2905.64 3821.05,2905.64 3832.68,2917.27 3832.68,2950.32 3832.68,2969.5 C91_30.2@3869.76,2969.5 ; 3416.17,3023.16 3416.17,3180.64 ; 3416.17,3180.64 3416.17,3290.87 3416.17,3458.28 ; 3416.17,3180.64 3416.76,3181.23 3805.19,3181.23 3832.68,3208.72 3832.68,3225.91 3832.68,3245.09 C91_32.2@3869.76,3245.09
  BottomLayer w30: 3731.18,178.35 3755.66,153.88 4591.11,153.88 v4@4596.22,158.98
P13V0: C130.2 IC1.7 IC6.14 L6.1 R1.2 R26.2 | length 1678.4
  TopLayer w10: IC1.7@5233.73,3153 5238.84,3147.89 5298.5,3207.55 R1.2@5298.5,3253 ; R26.2@5266.78,3414.15 5298.29,3414.15 v1(5298.65,3414.51)
  TopLayer w50: L6.1@4773.12,3052.62 4773.12,3063.27 4787.49,3077.64 4847.1,3077.64 4922.46,3153 IC1.7@5233.54,3153
  BottomLayer w10: IC1.7@5233.54,3153 5298.65,3218.11 v1(5298.65,3414.51)
  BottomLayer w50: IC6.14@5034.92,2639.25 5034.92,2816.43 5259.29,3040.8 5259.29,3053 ; IC1.7@5233.54,3153 5233.54,3078.75 5259.29,3053 ; C130.2@5354.57,3053 5259.29,3053
P13V0_SCSI: J3.25 J4.25 J5.25 J7.25 R30.2 R31.2 | length 3181.2
  TopLayer w30: R31.2@1268.84,3407.02 1373.04,3407.02 R30.2@1374.27,3408.24 1374.27,3344.02 1331.48,3301.24 1317.19,3301.24 1298.28,3282.33 J5.25@1298.29,3166.71
  BottomLayer w30: J3.25@835.19,1552.53 838.42,1555.76 838.42,1686.84 985.24,1833.66 ; J7.25@835.19,3166.71 841.51,3160.4 896.33,3160.4 963.84,3092.89 ; J4.25@1298.29,1552.53 1298.29,1659.59 1280.71,1677.17 1141.73,1677.17 1102.61,1716.29 1024.36,1716.29 1024.36,1794.54 985.24,1833.66 ; J5.25@1298.29,3166.71 1298.28,3213.44 1268.84,3242.89 1118.84,3242.89 968.84,3092.89 963.84,3092.89 ; 963.84,3092.89 963.84,1910.18 1016.24,1857.78 1009.35,1857.78 985.24,1833.66
P_LDO_EN: C36.2 IC13.6 IC27.5 R39.2 | length 728.5
  TopLayer w10: IC27.5@4855.92,1181.11 4926.43,1181.11 4926.5,1181.18 v1(4926.7,1181.18)
  BottomLayer w10: R39.2@5021.13,1181.36 5020.95,1181.18 v1(4926.7,1181.18) 4926.7,1263.29 5014.43,1351.02 5014.43,1464.5 4965.52,1513.41 4965.52,1593.68 5004.48,1632.64 IC13.6@5043.51,1632.64
PWR_EN: IC7.5 IC35.3 R183.2 | length 3596.8
  TopLayer w5: IC35.3@4902.81,2325.57 v1(4902.81,2350.3) ; IC7.5@5036.22,2077.68 5047.05,2077.68 5065.37,2096.01 5065.37,2129.02 5051.67,2142.72 5045.47,2142.72 4990.84,2197.35 v1(4990.84,2198.78) 5018.44,2226.38 5160.43,2226.38 5184.06,2202.76 5342.52,2202.76 5386.11,2246.35 5497.74,2246.35 v1(5692.91,2051.18) ; v1(5803.15,1881.89) 5803.15,889.76 5862.2,830.71 6031.5,830.71 6102.36,759.84 6102.36,530.51 6483.54,149.34 R183.2@6520.65,149.34
  BottomLayer w5: v1(4902.81,2350.3) 4936.12,2350.3 4994.09,2292.32 4994.09,2249.16 4991.18,2246.25 4991.18,2199.12 v1(4990.84,2198.78) ; v1(5692.91,2051.18) 5692.91,1992.13 v1(5803.15,1881.89)
PWR_GA0: IC16.3 R220.2 | length 65.4
  BottomLayer w5: IC16.3@7073.34,458.96 7136.67,458.96 R220.2@7138.14,457.49
PWR_GA1: IC16.2 R224.2 | length 70.2
  BottomLayer w5: IC16.2@7073.34,484.55 7127.25,484.55 7138.21,495.51 R224.2@7138.21,496.3
PWR_GA2: IC16.10 R223.2 | length 73.7
  BottomLayer w5: R223.2@6776.78,420.02 6776.78,419.23 6785.7,410.32 6800.28,410.32 6802.82,407.78 IC16.10@6844.99,407.78
PWR_GA3: IC16.9 R222.2 | length 83.6
  BottomLayer w5: R222.2@6767.05,368.56 6791.13,368.56 6804.76,382.19 IC16.9@6844.99,382.19
REF: C9.2 C12.1 C78.2 C79.1 C81.2 IC3.6 IC5.18 IC5.41 IC18.18 IC18.41 TP5.1 | length 2010.4
  TopLayer w10: v1(3485.98,113.71) 3505.67,113.71 TP5.1@3533.23,86.15 ; v1@3500.35,383.47 3500.35,594.65 3503.11,597.41 3503.11,622.13 3500.35,624.89 3500.35,759.97 3500.07,760.26 3500.07,771.74 3498.54,773.27 3498.54,843.31 3517.13,861.9 3764.84,861.9 3784.84,841.9 3801.28,841.9 3821.28,861.9 3874.56,861.9 3890.26,877.6 3906.69,877.6 3934.36,849.93 v1(3974.17,849.93)
  BottomLayer w10: v1(3485.98,113.71) 3415.12,113.71 3399.06,129.77 3399.06,156.5 3423.19,180.64 3521.42,180.64 3531.85,191.07 IC3.6@3531.85,239.69 3531.85,273.75 3541.1,283 C81.2@3541.1,314.5 3522.09,333.51 3511.62,333.51 3493.69,351.44 3493.69,378.5 3493.69,403.15 3513.35,422.8 3513.35,415.01 3533.14,395.21 3536.98,395.21 3558.43,373.77 3601.91,373.77 3602.13,373.55 IC5.18@3643.76,373.55 IC18.18@3690.02,373.55 ; IC18.41@3875.06,676.7 3875.06,697.7 ; IC5.41@3875.06,722.96 3875.06,749.9 3870.14,754.81 3870.14,777.95 C9.2@3882.32,790.14 3887.04,790.14 3907.86,810.96 C12.1@3971.97,810.96 ; C12.1@3974.17,810.96 v1(3974.17,849.93)
  other v1: 3494.04,378.5
RESETn: IC5.1 IC18.1 IC19.2 TP16.1 | length 2827.9
  TopLayer w5: TP16.1@5382.97,1800.38 5395.75,1787.61 v1(5395.75,1743.63) 5465.48,1743.63 5469.83,1747.98 IC19.2@5531.27,1747.98
  Signal Layer 1 w5: v1(4033.23,326.31) 4033.23,321.24 4069.66,284.81 4324.77,284.81 4352.86,312.9 4445.02,312.9 4497.8,365.68 v1(4497.8,440.48) ; v1(5186.76,924.73) 5186.76,893.25 5198.58,881.43 5245.83,881.43 5266.96,902.56 5266.96,1293.36 5253.84,1306.48 5253.84,1682.33 5315.14,1743.63 v1(5395.75,1743.63)
  BottomLayer w5: IC5.1@4012.85,280.05 IC18.1@4012.85,326.31 v1(4033.23,326.31) ; v1(4497.8,440.48) 4545.04,440.48 5031.13,926.57 5184.92,926.57 v1(5186.76,924.73)
RST: IC16.5 IC16.6 IC16.12 IC16.13 IC24.3 R229.2 T10.1 | length 1469.6
  TopLayer w5: v1(6342.39,472.31) 6342.39,370.21 6448.82,263.78 6653.54,263.78 ; T10.1@6655.51,218.5 6655.51,261.81 6653.54,263.78 ; v1(7013.15,385.24) 7012.31,384.39 6995.81,384.39 6993.31,381.89 6905.51,381.89 6787.4,263.78 6655.51,263.78 6653.54,263.78
  BottomLayer w5: v1(6342.39,472.31) IC24.3@6423.76,472.31 ; IC24.3@6424.52,471.55 R229.2@6488.04,471.55 ; IC16.12@6844.99,458.96 6898.28,458.96 ; IC16.13@6844.99,484.55 6887.47,484.55 6898.28,473.74 6898.28,458.96 ; v1@7012.27,384.35 7014.43,382.19 IC16.6@7073.34,382.19 ; v1(7013.15,385.24) 7013.15,386.71 7001.62,398.23 7001.62,407.78 ; IC16.5@7073.34,407.78 7001.62,407.78 ; 6898.28,458.96 6915.02,458.96 6966.21,407.78 7001.62,407.78
SCKI: IC5.54 IC18.54 IC23.11 R11.1 R82.2 R117.2 TP1.1 | length 6997.9
  TopLayer w6: IC23.11@655.77,-11.05 702.77,-11.05 v1(718.84,-27.11) ; v1(4519.68,-11.81) 4519.68,7.87 4559.06,47.24 v1(4559.06,263.78) ; v1(5271.18,1572.75) 5271.18,1635.26 TP1.1@5272.4,1636.48 5294.04,1658.11 5294.04,1664.41 5328.52,1698.89 R11.1@5369.64,1698.89
  Signal Layer 1 w6: v1(718.84,-27.11) 775.97,-84.24 864.33,-127.3 977.33,-127.9 ccw(c978.11,19.21) 978.11,-127.9 2159.29,-127.9 4405.51,-127.31 4519.68,-13.14 v1(4519.68,-11.81) ; v1(4399.37,798.75) 4399.37,767.25 4543.94,622.68 4543.94,452.64 4559.06,437.52 v1(4559.06,263.78)
  BottomLayer w6: R82.2@649.37,-59.52 686.43,-59.52 v1(718.84,-27.11) ; IC18.54@4040.41,550.72 IC5.54@4086.67,550.72 4178.77,550.72 4225.64,597.58 4225.64,598.94 4284.88,658.18 4284.88,715.76 4324.69,755.57 R117.2@4371.81,755.57 4371.81,790.87 4379.68,798.75 v1(4399.37,798.75) 4406.21,798.75 4419.18,785.78 4679.35,785.78 4864.06,970.49 4864.06,976.04 5013.54,1125.52 5088.35,1125.52 5195.3,1232.47 5195.3,1312.07 5230.94,1347.7 5230.94,1532.5 v1(5271.18,1572.75)
SDI: IC5.55 IC18.55 IC23.14 R13.1 R58.2 R116.2 TP2.1 | length 7049.3
  TopLayer w6: IC23.14@655.77,65.73 v1(721,65.73) ; v1(4469.79,-22.33) 4469.79,20.98 4515.75,66.93 v1(4515.75,208.66) ; TP2.1@5280.01,1728.6 TP2.1@5273.39,1721.98 ; v1(5281.37,1679.43) 5281.37,1713.99 TP2.1@5273.39,1721.98 ; R13.1@5446.97,1721.98 TP2.1@5273.39,1721.98
  Signal Layer 1 w6: v1(721,65.73) 721,45.73 873.03,-106.3 965.84,-106.3 ccw(c978.11,19.21) 990.38,-106.3 2146.94,-106.3 ccw(c2159.21,19.21) 2171.48,-106.3 4251.97,-106.3 4287.4,-70.87 4421.26,-70.87 v1(4469.79,-22.33) ; v1(4403.31,727.88) 4403.31,696.39 4427.84,671.85 4459.34,671.85 4515.75,615.44 v1(4515.75,208.66)
  BottomLayer w6: R58.2@649.37,68.43 718.3,68.43 v1(721,65.73) ; IC18.55@4040.41,531.03 IC5.55@4086.67,531.03 4110.54,531.03 4111.97,532.46 4176.07,532.46 4236.64,593.03 4236.64,594.38 4305.05,662.8 4328.02,662.8 4343.57,678.34 4353.77,678.34 R116.2@4371.81,696.39 4371.81,723.94 4375.75,727.88 v1(4403.31,727.88) 4659.21,727.88 5033.23,1101.9 5098.26,1101.9 5213.95,1217.6 5213.95,1297.96 5253.34,1337.35 5253.34,1506.56 5301.89,1555.12 5301.89,1658.93 v1(5281.37,1679.43)